# Altium PCB SOLAR_CLEANER_PCB.PcbDoc (part 2 of 2)
Units mm, origin at the board's own origin, x right, y up, seen from the top; angles counter-clockwise.
Board outline 138.79 x 100.69 mm, 2 copper layers (Top Layer, Bottom Layer); 75 components, 78 nets, 389 pads, 294 vias.
Unrouted connection lines stored in the file: 2.
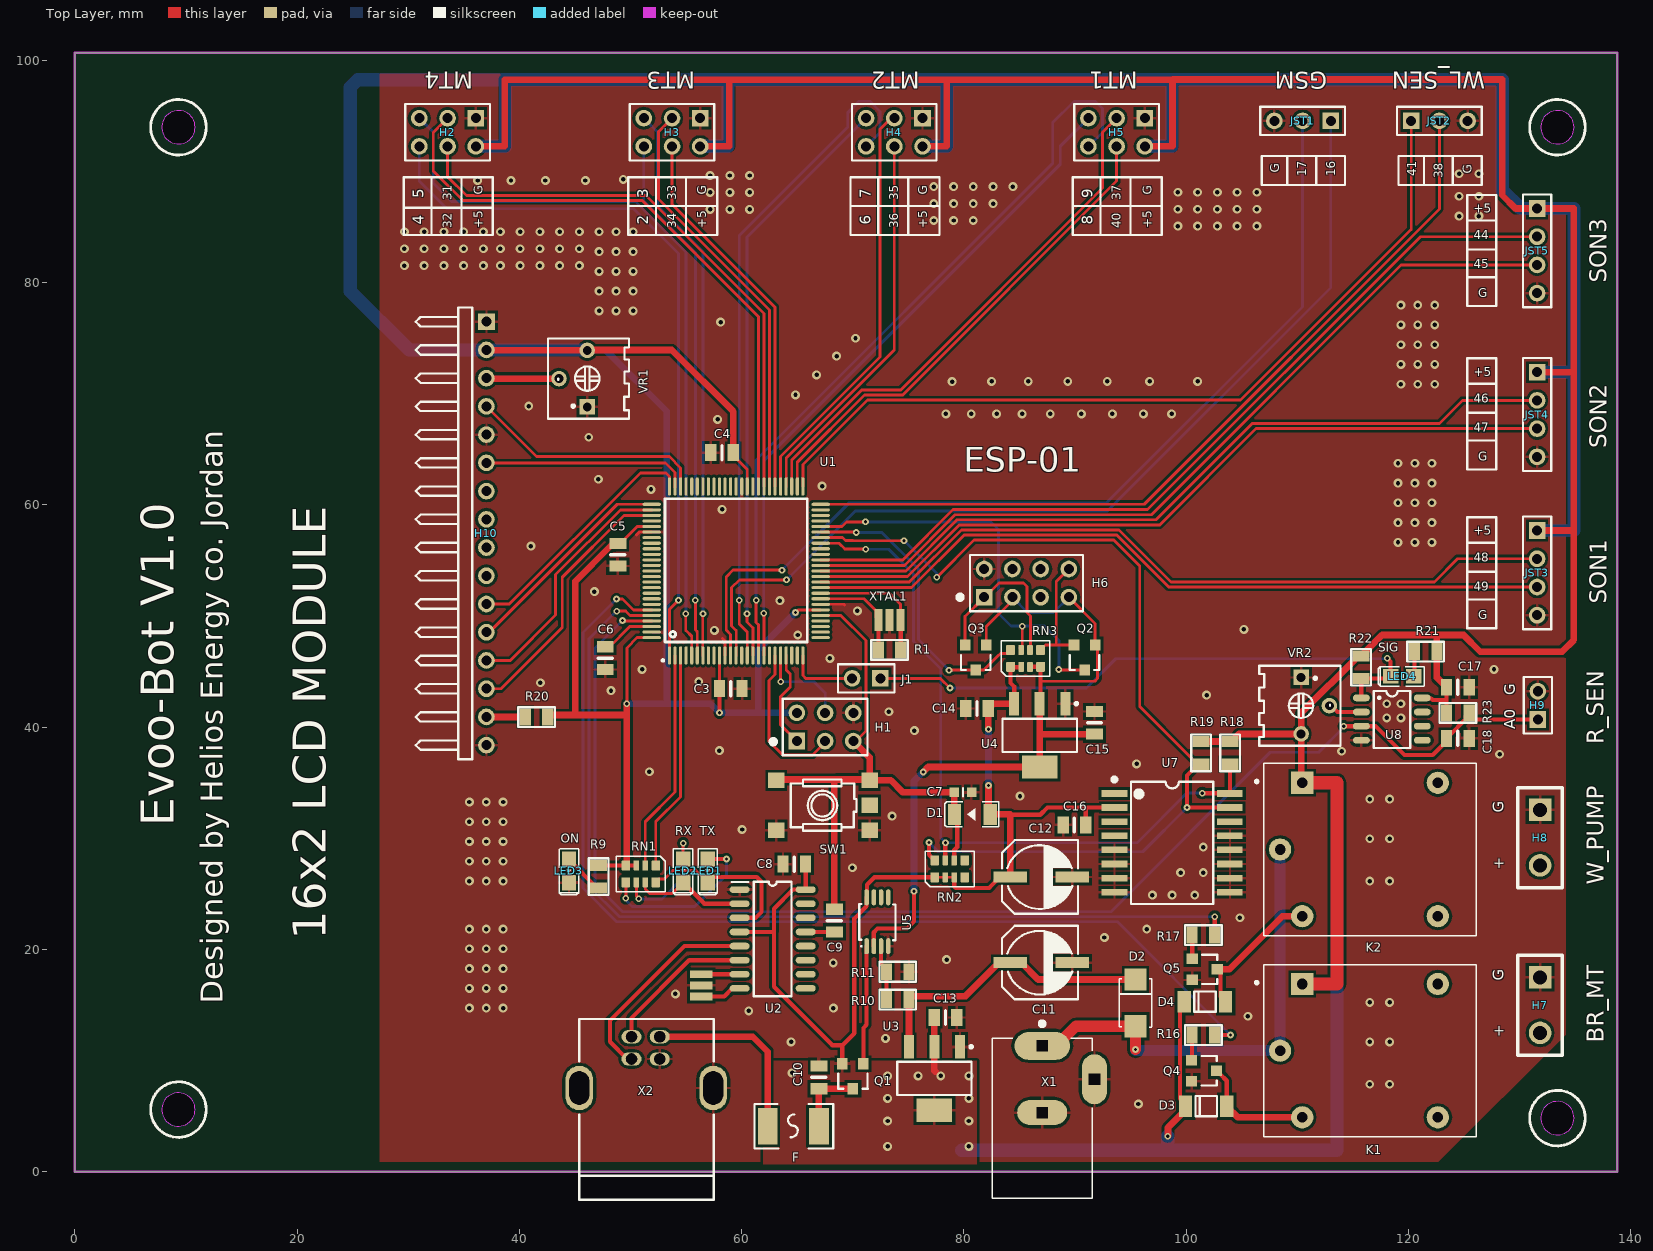
[diagram p0: Top Layer view]

## Silkscreen, mask and mechanical layers (free items; w line width, h text height) (continued)
Top Overlay: (continued)
  lines w0.2: 29.6,86.75 34.8,86.75 37.6,86.75 37.6,86.7 ; 32.1,84.3 32.1,89.5 ; 49.8,86.9 57.8,86.9 ; 52.3,84.3 52.3,89.5 ; 69.8,86.9 77.8,86.9 ; 72.3,84.3 72.3,89.5 ; 89.8,86.9 97.8,86.9 ; 92.3,84.3 92.3,89.5 ; 109.1,88.8 109.1,91.4 ; 111.7,88.8 111.7,91.4 ; 121.4,88.8 121.4,91.4 ; 124,88.8 124,91.4 ; 125.3,51.4 125.3,51.5 127.9,51.5 ; 125.3,54 127.9,54 ; 125.3,56.6 127.9,56.6 ; 125.3,65.7 125.3,65.8 127.9,65.8 ; 125.3,68.3 127.9,68.3 ; 125.3,70.9 127.9,70.9 ; 125.3,80.4 125.3,80.5 127.9,80.5 ; 125.3,83 127.9,83 ; 125.3,85.6 127.9,85.6 ; 34.8,84.3 37.6,84.3 37.6,84.6 37.6,89.5 37.2,89.5 34.8,89.5 ; 34.8,84.3 34.8,89.5 ; 34.8,84.3 29.6,84.3 29.6,89.5 34.8,89.5 ; 55,84.3 57.8,84.3 57.8,89.5 55,89.5 ; 55,84.3 55,89.5 ; 55,84.3 49.8,84.3 49.8,89.5 55,89.5 ; 75,84.3 77.8,84.3 77.8,89.5 75,89.5 ; 75,84.3 75,89.5 ; 75,84.3 69.8,84.3 69.8,89.5 75,89.5 ; 95,84.3 97.8,84.3 97.8,89.5 95,89.5 ; 95,84.3 89.8,84.3 89.8,89.5 95,89.5 ; 95,84.3 95,89.5 ; 106.8,88.8 106.8,91.4 114.3,91.4 114.3,88.8 106.8,88.8 ; 119.1,88.8 126.6,88.8 126.6,91.4 119.1,91.4 119.1,88.8 ; 125.3,48.9 125.3,58.9 127.9,58.9 127.9,48.9 125.3,48.9 ; 125.3,63.2 125.3,73.2 127.9,73.2 127.9,63.2 125.3,63.2 ; 125.3,77.9 127.9,77.9 127.9,87.9 125.3,87.9 125.3,77.9
  text "G" at 108.4,89.9 h0.8 r90
  text "G" at 125.7,89.8 h0.8 r90
  text "17" at 110.8,89.6 h0.8 r90
  text "16" at 113.4,89.6 h0.8 r90
  text "41" at 120.7,89.6 h0.8 r90
  text "38" at 123.1,89.4 h0.8 r90
  text "G" at 36.7,87.9 h0.8 r90
  text "G" at 56.8,87.9 h0.8 r90
  text "G" at 76.7,87.9 h0.8 r90
  text "G" at 96.9,87.9 h0.8 r90
  text "5" at 31.4,87.6 h1 r90
  text "3" at 51.6,87.6 h1 r90
  text "7" at 71.6,87.6 h1 r90
  text "9" at 91.6,87.6 h1 r90
  text "31" at 33.9,87.4 h0.8 r90
  text "33" at 54.1,87.4 h0.8 r90
  text "35" at 74.1,87.4 h0.8 r90
  text "37" at 94.1,87.4 h0.8 r90
  text "+5" at 125.9,86.3 h0.8
  text "4" at 31.4,85.2 h1 r90
  text "2" at 51.6,85.2 h1 r90
  text "6" at 71.6,85.2 h1 r90
  text "8" at 91.6,85.2 h1 r90
  text "32" at 33.9,84.9 h0.8 r90
  text "+5" at 36.7,84.9 h0.8 r90
  text "34" at 54.1,84.9 h0.8 r90
  text "+5" at 56.8,84.9 h0.8 r90
  text "36" at 74.1,84.9 h0.8 r90
  text "+5" at 76.7,84.9 h0.8 r90
  text "40" at 94.1,84.9 h0.8 r90
  text "+5" at 96.9,84.9 h0.8 r90
  text "44" at 125.9,83.9 h0.8
  text "45" at 125.9,81.3 h0.8
  text "G" at 126.3,78.7 h0.8
  text "+5" at 125.9,71.6 h0.8
  text "46" at 125.9,69.2 h0.8
  text "47" at 125.9,66.6 h0.8
  text "G" at 126.3,64 h0.8
  text "ESP-01" at 79.97,62.97 h2.2
  text "+5" at 125.9,57.3 h0.8
  text "48" at 125.9,54.9 h0.8
  text "49" at 125.9,52.3 h0.8
  text "XTAL1" at 71.5,51.4 h0.8
  text "G" at 126.3,49.7 h0.8
  text "G" at 129.6,42.9 h1 r90
  text "A0" at 129.6,39.8 h1 r90
  text "G" at 128.6,32.3 h1 r90
  text "Evoo-Bot V1.0" at 8.9,31.1 h3 r90
  text "+" at 128.6,27.2 h1 r90
  text "16x2 LCD MODULE" at 22.56,20.89 h3 r90
  text "G" at 128.6,17.2 h1 r90
  text "Designed by Helios Energy co. Jordan" at 13.3,15.1 h2 r90
  text "+" at 128.6,12.1 h1 r90
Mechanical 1:
  lines w0.254: -4.508,1.27 -4,-0.254 ; -4.508,99.156 -4,100.68 ; -4.254,-0.254 -3.746,-0.254 ; -4.254,100.68 -3.746,100.68 ; -4,41.554 -4,-0.254 ; -4,58.872 -4,100.68 ; -3.492,1.27 -4,-0.254 ; -3.492,99.156 -4,100.68 ; 0,-6.254 0,-5.746 ; 1.524,-6.508 0,-6 ; 1.524,-5.492 0,-6 ; 61.498,-6 0,-6 ; 77.292,-6 138.79,-6 ; 137.266,-6.508 138.79,-6 ; 137.266,-5.492 138.79,-6 ; 138.79,-6.254 138.79,-5.746
  text "100.934 (mm)" at -3.086,41.808 h1.52 r90
  text "138.79 (mm)" at 61.752,-6.914 h1.52